# Altium PCB LED_Strip_RL.PcbDoc
Units mm, origin at the board's own origin, x right, y up, seen from the top; angles counter-clockwise.
Board outline 210 x 7 mm, 2 copper layers (Top Layer, Bottom Layer); 33 components, 31 nets, 123 pads, 13 vias.
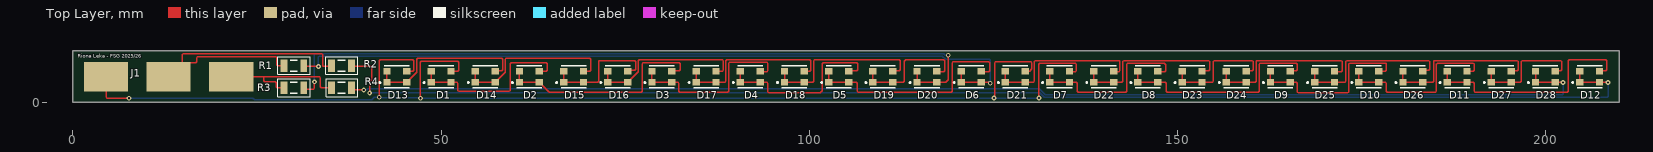
[diagram p0: Top Layer view]
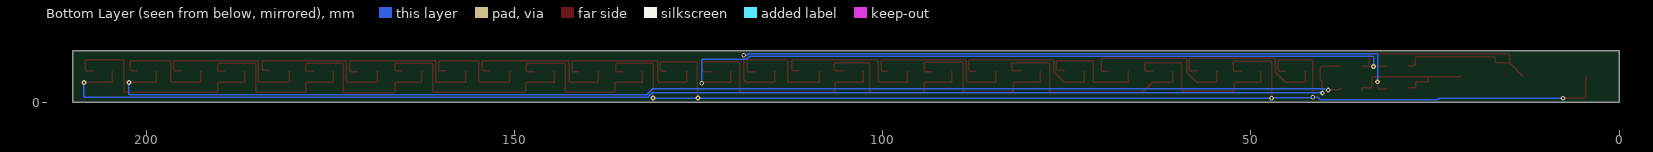
[diagram p1: Bottom Layer view, seen from below]
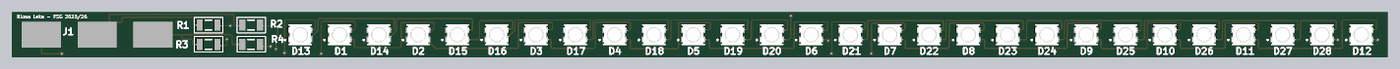
[diagram p2: 3D render of the assembled board from above, using the file's embedded part models]

## Layer stack, top to bottom
Top Solder: solder mask 0.0102, Solder Resist, Dk 3.5
Top Layer: signal copper 0.0356
Dielectric 1: dielectric 0.32, FR-4, Dk 4.8
Bottom Layer: signal copper 0.0356
Bottom Solder: solder mask 0.0102, Solder Resist, Dk 3.5

## Board outline
0,0 0,7 210,7 210,0

## Design rules (kind name [scope] priority, off if disabled: settings)
AcuteAngle [All] p1: minimum=6.00000000000000E+0001 checktracksonly=FALSE
BoardOutlineClearance "BoardOutlineClearance Overlay" [OnLayer('Top Overlay') or OnLayer('Bottom Overlay')] p1: gap=-2 ignorepadtopadclearanceinfootprint=FALSE
BoardOutlineClearance "BoardOutlineClearance general" [All] p2: gap=0.25 ignorepadtopadclearanceinfootprint=FALSE
Clearance "Clearance TS-LV without coating" [InNetClass('TS') vs InNetClass('LV')] p1: gap=20 ignorepadtopadclearanceinfootprint=TRUE except(0: Arc-Text Track-Text SMDPad-Text THPad-Text Via-Text Fill-Text Poly-Text Region-Text Text-Text Text-Hole) // without Conformal Coating (Rules 2023.1.0: EV 4.3.6)
Clearance "Clearance TS-LV" [InNetClass('TS') vs InNetClass('LV')] p2: gap=4.15 ignorepadtopadclearanceinfootprint=TRUE except(0: Arc-Text Track-Text SMDPad-Text THPad-Text Via-Text Fill-Text Poly-Text Region-Text Text-Text)
Clearance "Clearance TS-TS" [InNetClass('TS+') vs InNetClass('TS-')] p3: gap=3.15 ignorepadtopadclearanceinfootprint=TRUE except(0: Arc-Text Track-Text SMDPad-Text THPad-Text Via-Text Fill-Text Poly-Text Region-Text Text-Text)
Clearance "Clearance general" [All] p4: gap=0.15 ignorepadtopadclearanceinfootprint=TRUE except(0: Arc-Text Track-Text SMDPad-Text THPad-Text Via-Text Text-Text)
ComponentClearance [All] p1: gap=0.1 collisioncheckmode=3 verticalgap=1 showdistances=FALSE donotcheckwithout3dbody=TRUE
Creepage [InNetClass('TS') vs InNetClass('LV')] p1: checkdistance=5 applytopolygonpour=TRUE // Kriechstrecke
DiffPairsRouting [All] p1: maxlimit=0.5 minlimit=0.15 mostfreqgap=0.2 toplayer_minwidth=0.15 toplayer_maxwidth=0.5 toplayer_prefwidth=0.2 bottomlayer_minwidth=0.15 bottomlayer_maxwidth=0.5 bottomlayer_prefwidth=0.2 maxuncoupledlength=12.7
Height [All] p1: minheight=0 maxheight=100 prefheight=15
HoleSize [All] p1: absolutevalues=TRUE maxlimit=5 minlimit=0.25 maxpercent=80.000 minpercent=20.000
HoleToHoleClearance [All] p1: gap=0.5 allowstackedmicrovias=FALSE
MinimumAnnularRing [All] p1: minimumring=0.175
MinimumSolderMaskSliver [All] p1: minsoldermaskwidth=0.15
PasteMaskExpansion "PasteMaskExpansion THT" [OnMultiLayer] p1: expansion=-2539.975 usepaste=FALSE // THT-parts without paste
PasteMaskExpansion [All] p2: expansion=0 percent=10.000000
PlaneClearance [All] p1: clearance=0.5
PlaneConnect [All] p1: planeconnectstyle=Relief reliefexpansion=0.5 reliefentries=4 reliefconductorwidth=0.25 reliefairgap=0.15
PolygonConnect "PolygonConnect Stitching Via" [IsStitchingVia] p1: connectstyle=Direct reliefconductorwidth=0.254 reliefentries=4 polygonreliefangle="90 Angle" airgapwidth=0.254
PolygonConnect "PolygonConnect general" [All] p2: thpad.connectstyle=Relief thpad.reliefconductorwidth=0.25 thpad.reliefentries=4 thpad.polygonreliefangle="45 Angle" thpad.airgapwidth=0.2 smdpad.connectstyle=Relief smdpad.reliefconductorwidth=0.25 smdpad.reliefentries=4 smdpad.polygonreliefangle="90 Angle" smdpad.airgapwidth=0.2 via.connectstyle=Relief via.reliefconductorwidth=0.25 via.reliefentries=4 via.polygonreliefangle="45 Angle" via.airgapwidth=0.2
RoutingCorners [All] p1: cornerstyle=45-Degree minsetback=2.5 maxsetback=2.5
RoutingTopology "RoutingTopology Top" [OnLayer('Top Layer')] p1: topology=Vertical // Helplines top-layer
RoutingTopology "RoutingTopology Bottom" [OnLayer('Bottom Layer')] p2: topology=Horizontal // Helplines bottom-layer
RoutingVias "RoutingVias StitchingVias" [IsStitchingVia] p1: holewidth=0.3 width=0.65 viastyle="Through Hole" minholewidth=0.25 minwidth=0.6 maxholewidth=0.3 maxwidth=0.65
RoutingVias "RoutingVias general" [All] p2: holewidth=0.3 width=0.65 viastyle="Through Hole" minholewidth=0.25 minwidth=0.6 maxholewidth=0.6 maxwidth=0.85
SMDToCorner [All] p1: distance=39370
SilkToSilkClearance [All] p1: silktosilkclearance=0
SilkToSolderMaskClearance [IsPad] p1: minsilkscreentomaskgap=0.1 clearancetoexposedcopper=FALSE
SolderMaskExpansion "SolderMaskExpansion Vias" [IsVia] p1: expansion=0.1 istentingtop=TRUE // vias tented
SolderMaskExpansion "SolderMaskExpansion general" [All] p2: expansion=0.1 istentingtop=FALSE
UnRoutedNet [All] p1: checkbadconnections=TRUE
Width "Width Powerlane" [InNetClass('Power')] p1: maxlimit=5 minlimit=0.15 preferedwidth=0.5
Width "Width general" [All] p2: maxlimit=3 minlimit=0.15 preferedwidth=0.2
16 further rules are at their usual default settings.

## Components (designator, comment, footprint, x,y, rotation, side; value= is the part's Value field where it differs from the comment)
D1 "Blue, 3.2V, 120°" "WL-SMTW_3528_LPCC 4" 50,3.5 r0 top
D2 "Blue, 3.2V, 120°" "WL-SMTW_3528_LPCC 4" 62,3.5 r0 top
D3 "Blue, 3.2V, 120°" "WL-SMTW_3528_LPCC 4" 80,3.5 r0 top
D4 "Blue, 3.2V, 120°" "WL-SMTW_3528_LPCC 4" 92,3.5 r0 top
D5 "Blue, 3.2V, 120°" "WL-SMTW_3528_LPCC 4" 104,3.5 r0 top
D6 "Blue, 3.2V, 120°" "WL-SMTW_3528_LPCC 4" 122,3.5 r0 top
D7 "Blue, 3.2V, 120°" "WL-SMTW_3528_LPCC 4" 134,3.5 r0 top
D8 "Blue, 3.2V, 120°" "WL-SMTW_3528_LPCC 4" 146,3.5 r0 top
D9 "Blue, 3.2V, 120°" "WL-SMTW_3528_LPCC 4" 164,3.5 r0 top
D10 "Blue, 3.2V, 120°" "WL-SMTW_3528_LPCC 4" 176,3.5 r0 top
D11 "Blue, 3.2V, 120°" "WL-SMTW_3528_LPCC 4" 188,3.5 r0 top
D12 "Blue, 3.2V, 120°" "WL-SMTW_3528_LPCC 4" 206,3.5 r0 top
D13 "Yellow, 2.4V, 120°" "WL-SMTW_3528_LPCC 4" 44,3.5 r0 top
D14 "Yellow, 2.4V, 120°" "WL-SMTW_3528_LPCC 4" 56,3.5 r0 top
D15 "Yellow, 2.4V, 120°" "WL-SMTW_3528_LPCC 4" 68,3.5 r0 top
D16 "Yellow, 2.4V, 120°" "WL-SMTW_3528_LPCC 4" 74,3.5 r0 top
D17 "Yellow, 2.4V, 120°" "WL-SMTW_3528_LPCC 4" 86,3.5 r0 top
D18 "Yellow, 2.4V, 120°" "WL-SMTW_3528_LPCC 4" 98,3.5 r0 top
D19 "Yellow, 2.4V, 120°" "WL-SMTW_3528_LPCC 4" 110,3.5 r0 top
D20 "Yellow, 2.4V, 120°" "WL-SMTW_3528_LPCC 4" 116,3.5 r0 top
D21 "Yellow, 2.4V, 120°" "WL-SMTW_3528_LPCC 4" 128,3.5 r0 top
D22 "Yellow, 2.4V, 120°" "WL-SMTW_3528_LPCC 4" 140,3.5 r0 top
D23 "Yellow, 2.4V, 120°" "WL-SMTW_3528_LPCC 4" 152,3.5 r0 top
D24 "Yellow, 2.4V, 120°" "WL-SMTW_3528_LPCC 4" 158,3.5 r0 top
D25 "Yellow, 2.4V, 120°" "WL-SMTW_3528_LPCC 4" 170,3.5 r0 top
D26 "Yellow, 2.4V, 120°" "WL-SMTW_3528_LPCC 4" 182,3.5 r0 top
D27 "Yellow, 2.4V, 120°" "WL-SMTW_3528_LPCC 4" 194,3.5 r0 top
D28 "Yellow, 2.4V, 120°" "WL-SMTW_3528_LPCC 4" 200,3.5 r0 top
J1 "Pad-Connenctor" "TSAL-L Connector" 13,3.5 r90 top
R1 "Resistor" 1206(3216)_L 30,5 r180 top value=100R
R2 "Resistor" 1206(3216)_L 36.5,5 r180 top value=100R
R3 "Resistor" 1206(3216)_L 30,2 r180 top value=120R
R4 "Resistor" 1206(3216)_L 36.5,2 r180 top value=120R

## Footprints (in the part's own frame and the unit in brackets; to place one, negate y for a bottom-side part, rotate by r counter-clockwise, add the part's x,y. Pads: shape width x height; smd on the part's side, far side on the other; paste and mask are expansions set on the pad)
1206(3216)_L [mm] "Chip Resistor, Body 3.2x1.6mm, IPC High Density"
  rect 0.95x1.7 smd: 1(-1.35,0) 2(1.35,0)
  silkscreen extent -2.2,-1.2 2.2,1.2, body extent -1.67,-0.87 1.67,0.87, height 0.75
"TSAL-L Connector" [mm]
  rect 4x6 smd paste+0 mask+0: 1(0,8.5) 2(0,0) 3(0,-8.5)
"WL-SMTW_3528_LPCC 4" [mm] "SMD Mono-color TOP LED, body 3.5x2.8mm"
  rect 1x0.9 smd: 1(-1.35,-0.75) 2(1.35,-0.75) 3(1.35,0.75) 4(-1.35,0.75)
  silkscreen extent -2.4,-1.5 1.7,1.5, body extent -1.75,-1.4 1.75,1.4, height 1.86

## Part data
D1 D2 D3 D4 D5 D6 D7 D8 D9 D10 D11 D12: library part 150141BS73130, "WL-SMTW Mono-color TOP LED Waterclear, size 3528, Blue, 3.2V, 120°", Case/Size Code=3528, Emitting Color=Blue, Forward Voltage=3.2V, Manufacturer="Wurth Elektronik", Operating Temperature Max=85°C, Operating Temperature Min=-40°C, Category="Signal LEDs", Chip Technology=InGaN, ComponentLink1Description="Website Link", ComponentLink1URL=https://www.we-online.com/redexpert/article/150141BS73130?ad, ComponentLink2Description="Datasheet Link", ComponentLink2URL=https://www.we-online.com/redexpert/spec/150141BS73130?ad, Dominant Wavelength=470nm, Height=1.85mm, Length=3.5mm, Luminous Intensity=1000mcd, Manufacturer Part Number=150141BS73130, Match Code=WL-SMTW, Mount="Surface Mount", Packaging="Tape and Reel", Peak Wavelength=465nm, Viewing Angle=120°, Width=2.8mm
D13 D14 D15 D16 D17 D18 D19 D20 D21 D22 D23 D24 D25 D26 D27 D28: library part 150141YS73130, "WL-SMTW Mono-color TOP LED Waterclear, size 3528, Yellow, 2.4V, 120°", Case/Size Code=3528, Emitting Color=Yellow, Forward Voltage=2.4V, Manufacturer="Wurth Elektronik", Operating Temperature Max=85°C, Operating Temperature Min=-40°C, Category="Signal LEDs", Chip Technology=AlInGaP, ComponentLink1Description="Website Link", ComponentLink1URL=https://www.we-online.com/redexpert/article/150141YS73130?ad, ComponentLink2Description="Datasheet Link", ComponentLink2URL=https://www.we-online.com/redexpert/spec/150141YS73130?ad, Dominant Wavelength=590nm, Height=1.85mm, Length=3.5mm, Luminous Intensity=2000mcd, Manufacturer Part Number=150141YS73130, Match Code=WL-SMTW, Mount="Surface Mount", Packaging="Tape and Reel", Peak Wavelength=592nm, Viewing Angle=120°, Width=2.8mm
J1: library part Pad-Connector, "3 pins. fits the 7mm"
R1 R2: library part RES-Std, "General resistor", Resistance=100R, Tolerance=*%
R3 R4: library part RES-Std, "General resistor", Resistance=120R, Tolerance=*%

## Via types
v1: diameter 0.65, hole 0.3, Top Layer to Bottom Layer, tented both sides, 13 vias

## Nets (pads, with @x,y where several pads share a name; then routed paths per layer and width w, separated by ;. In a path a pad name is that pad's centre, name@x,y a point inside that pad or via, vN(x,y) a via of type N, cw(c..) or ccw(c..) an arc to the next point about the centre after c; other vN are vias at no path point)
+24V: D1.3 D7.3 D13.3 D21.3 J1.1 | length 177.9
  Top Layer w0.2: J1.1 4.5,0.692 4.617,0.575 v1(7.6,0.575) ; v1(41.6,0.7) 41.6,5.683 41.717,5.8 46.183,5.8 46.3,5.683 46.3,4.367 46.183,4.25 D13.3 ; v1(47.2,0.575) 47.2,5.483 47.317,5.6 52.283,5.6 52.4,5.483 52.4,4.367 52.283,4.25 D1.3 ; v1(125.1,0.6) 125.175,0.675 125.175,5.375 125.3,5.5 130.133,5.5 130.25,5.383 130.25,4.55 129.95,4.25 D21.3 ; v1(131.2,0.6) 131.2,5.183 131.317,5.3 136.183,5.3 136.3,5.183 136.3,4.317 136.183,4.2 135.4,4.2 D7.3
  Bottom Layer w0.2: v1(7.6,0.575) 24.447,0.575 24.672,0.35 40.558,0.35 40.908,0.7 v1(41.6,0.7) 41.663,0.637 47.137,0.637 v1(47.2,0.575) 47.213,0.587 125.087,0.587 v1(125.1,0.6) v1(131.2,0.6)
BLUE_ASSI: J1.2 R1.2 R2.2 | length 41.1
  Top Layer w0.2: J1.2 J1.2@14.871,5.371 ; R1.2 27.817,5 27.7,5.117 27.7,6.083 27.583,6.2 16.917,6.2 16.8,6.083 16.8,5.5 16.671,5.371 J1.2@14.871,5.371 ; R2.2@35,4.9 34.017,4.9 33.9,5.017 33.9,6.533 33.783,6.65 14.988,6.65 14.871,6.533 J1.2@14.871,5.371
NetD1_1: D1.1 D1.2 D1.4 D2.3 | length 24.2
  Top Layer w0.2: D1.4 D1.1 D1.2 52.183,2.75 52.3,2.633 52.3,1.617 52.417,1.5 59.283,1.5 59.4,1.617 59.4,5.283 59.517,5.4 64.283,5.4 64.4,5.283 64.4,4.367 64.283,4.25 D2.3
NetD2_1: D2.1 D2.2 D2.4 D3.3 | length 29.9
  Top Layer w0.2: D2.4 D2.1 D2.2 64.7,1.4 77.183,1.4 77.3,1.517 77.3,5.283 77.417,5.4 82.383,5.4 82.5,5.283 82.5,4.417 82.383,4.3 81.4,4.3 D3.3
NetD3_1: D3.1 D3.2 D3.4 D4.3 | length 24.6
  Top Layer w0.2: D3.4 D3.1 D3.2 82.183,2.75 82.3,2.633 82.3,1.517 82.417,1.4 88.933,1.4 89.05,1.517 89.05,5.333 89.167,5.45 94.283,5.45 94.4,5.333 94.4,4.317 94.283,4.2 93.4,4.2 D4.3
NetD4_1: D4.1 D4.2 D4.4 D5.3 | length 24.9
  Top Layer w0.2: D4.4 D4.1 D4.2 94.283,2.75 94.4,2.633 94.4,1.417 94.517,1.3 101.483,1.3 101.765,1.582 101.765,5.283 101.882,5.4 106.483,5.4 106.6,5.283 106.6,4.417 106.483,4.3 105.4,4.3 D5.3
NetD5_1: D5.1 D5.2 D5.4 D6.3 | length 30.9
  Top Layer w0.2: D5.4 D5.1 D5.2 106.383,2.75 106.5,2.633 106.5,1.517 106.617,1.4 119.283,1.4 119.4,1.517 119.4,5.383 119.517,5.5 124.383,5.5 124.5,5.383 124.5,4.317 124.383,4.2 123.4,4.2 D6.3
NetD6_1: D6.1 D6.2 D6.4 R1.1 | length 103.3
  Top Layer w0.2: R1.1@31.55,5 31.65,4.9 v1(33.336,4.9) ; D6.4 D6.1 124.328,2.75 124.478,2.6 v1(124.6,2.6)
  Bottom Layer w0.2: v1(33.336,4.9) 33.334,4.902 33.334,6.183 33.451,6.3 118.1,6.3 118.55,5.85 124.483,5.85 124.6,5.733 v1(124.6,2.6)
NetD7_1: D7.1 D7.2 D7.4 D8.3 | length 24.2
  Top Layer w0.2: D7.4 D7.1 D7.2 136.25,2.75 136.4,2.6 136.4,1.517 136.517,1.4 142.983,1.4 143.1,1.517 143.1,5.183 143.217,5.3 148.2,5.3 148.4,5.1 148.4,4.317 148.283,4.2 147.4,4.2 D8.3
NetD8_1: D8.1 D8.2 D8.4 D9.3 | length 29.9
  Top Layer w0.2: D8.4 D8.1 D8.2 148.35,2.75 148.5,2.6 148.5,1.517 148.617,1.4 160.983,1.4 161.1,1.517 161.1,5.183 161.217,5.3 166.183,5.3 166.3,5.183 166.3,4.417 166.183,4.3 165.4,4.3 D9.3
NetD9_1: D9.1 D9.2 D9.4 D10.3 | length 24.5
  Top Layer w0.2: D9.4 D9.1 D9.2 166.183,2.75 166.3,2.633 166.3,1.417 166.417,1.3 173.183,1.3 173.3,1.417 173.3,5.233 173.417,5.35 178.283,5.35 178.4,5.233 178.4,4.4 178.25,4.25 D10.3
NetD10_1: D10.1 D10.2 D10.4 D11.3 | length 24.1
  Top Layer w0.2: D10.4 D10.1 D10.2 178.283,2.75 178.4,2.633 178.4,1.517 178.517,1.4 185.083,1.4 185.2,1.517 185.2,5.183 185.367,5.35 190.183,5.35 190.3,5.233 190.3,4.367 190.183,4.25 D11.3
NetD11_1: D11.1 D11.2 D11.4 D12.3 | length 31
  Top Layer w0.2: D11.4 D11.1 D11.2 190.183,2.75 190.3,2.633 190.3,1.517 190.417,1.4 202.983,1.4 203.1,1.517 203.1,5.683 203.217,5.8 208.183,5.8 208.3,5.683 208.3,4.417 208.183,4.3 207.4,4.3 D12.3
NetD12_1: D12.1 D12.2 D12.4 R2.1 | length 182.1
  Top Layer w0.2: R2.1@37.9,4.9 40.45,4.9 40.567,4.783 40.567,3.086 40.3,2.819 v1(40.3,1.3) ; D12.4 D12.1 D12.2 208.45,2.75 v1(208.5,2.7)
  Bottom Layer w0.2: v1(40.3,1.3) 131.313,1.3 131.913,0.7 208.383,0.7 208.5,0.817 v1(208.5,2.7)
NetD13_1: D13.1 D13.2 D13.4 D14.3 | length 22.2
  Top Layer w0.2: D13.4 D13.1 D13.2 46.7,4.1 46.7,5.883 46.817,6 58.233,6 58.35,5.883 58.35,4.417 58.233,4.3 57.4,4.3 D14.3
NetD14_1: D14.1 D14.2 D14.4 D15.3 | length 22.1
  Top Layer w0.2: D14.4 D14.1 D14.2 58.7,4.1 58.7,5.883 58.817,6 70.183,6 70.3,5.883 70.3,4.367 70.183,4.25 D15.3
NetD15_1: D15.1 D15.2 D15.4 D16.3 | length 16.4
  Top Layer w0.2: D15.4 D15.1 D15.2 71.283,2.75 71.4,2.867 71.4,5.583 71.517,5.7 76.3,5.7 76.45,5.55 76.45,4.517 76.333,4.4 75.5,4.4 D16.3
NetD16_1: D16.1 D16.2 D16.4 D17.3 | length 21.7
  Top Layer w0.2: D16.4 D16.1 D16.2 76.8,4.2 76.8,5.683 76.917,5.8 88.233,5.8 88.35,5.683 88.35,4.367 88.233,4.25 D17.3
NetD17_1: D17.1 D17.2 D17.4 D18.3 | length 22.2
  Top Layer w0.2: D17.4 D17.1 D17.2 88.583,2.75 88.7,2.867 88.7,5.683 88.817,5.8 100.083,5.8 100.2,5.683 100.2,4.367 100.083,4.25 D18.3
NetD18_1: D18.1 D18.2 D18.4 D19.3 | length 22.5
  Top Layer w0.2: D18.4 D18.1 D18.2 100.483,2.75 100.6,2.867 100.6,5.683 100.717,5.8 112.233,5.8 112.35,5.683 112.35,4.417 112.233,4.3 111.4,4.3 D19.3
NetD19_1: D19.1 D19.2 D19.4 D20.3 | length 16.6
  Top Layer w0.2: D19.4 D19.1 D19.2 112.783,2.75 112.9,2.867 112.9,5.6 113.1,5.8 118.283,5.8 118.4,5.683 118.4,4.317 118.283,4.2 117.4,4.2 D20.3
NetD20_1: D20.1 D20.2 D20.4 R3.1 | length 101.5
  Top Layer w0.2: R3.1@31.55,2 31.75,1.8 32.683,1.8 32.8,1.917 v1(32.8,2.8) ; D20.4 D20.1 D20.2 118.55,2.75 118.9,3.1 v1(118.9,6.425)
  Bottom Layer w0.2: v1(32.8,2.8) 32.761,2.839 32.761,6.533 32.879,6.65 118.245,6.65 118.47,6.425 v1(118.9,6.425)
NetD21_1: D21.1 D21.2 D21.4 D22.3 | length 22.1
  Top Layer w0.2: D21.4 D21.1 D21.2 130.483,2.75 130.6,2.867 130.6,5.583 130.717,5.7 142.083,5.7 142.2,5.583 142.2,4.317 142.083,4.2 141.4,4.2 D22.3
NetD22_1: D22.1 D22.2 D22.4 D23.3 | length 22.4
  Top Layer w0.2: D22.4 D22.1 D22.2 142.483,2.75 142.6,2.867 142.6,5.583 142.717,5.7 154.283,5.7 154.4,5.583 154.4,4.417 154.283,4.3 153.4,4.3 D23.3
NetD23_1: D23.1 D23.2 D23.4 D24.3 | length 16.2
  Top Layer w0.2: D23.4 D23.1 D23.2 154.783,2.75 154.9,2.867 154.9,5.583 155.017,5.7 160.183,5.7 160.3,5.583 160.3,4.417 160.183,4.3 159.4,4.3 D24.3
NetD24_1: D24.1 D24.2 D24.4 D25.3 | length 22.5
  Top Layer w0.2: D24.4 D24.1 D24.2 160.583,2.75 160.7,2.867 160.7,5.583 160.817,5.7 172.283,5.7 172.4,5.583 172.4,4.317 172.283,4.2 171.4,4.2 D25.3
NetD25_1: D25.1 D25.2 D25.4 D26.3 | length 22.1
  Top Layer w0.2: D25.4 D25.1 D25.2 172.783,2.75 172.9,2.867 172.9,5.583 173.017,5.7 184.183,5.7 184.3,5.583 184.3,4.517 184.183,4.4 183.5,4.4 D26.3
NetD26_1: D26.1 D26.2 D26.4 D27.3 | length 22.2
  Top Layer w0.2: D26.4 D26.1 D26.2 184.683,2.75 184.8,2.867 184.8,5.583 184.917,5.7 196.183,5.7 196.3,5.583 196.3,4.417 196.183,4.3 195.4,4.3 D27.3
NetD27_1: D27.1 D27.2 D27.4 D28.3 | length 16
  Top Layer w0.2: D27.4 D27.1 D27.2 196.583,2.75 196.7,2.867 196.7,5.583 196.817,5.7 202.083,5.7 202.2,5.583 202.2,4.417 202.083,4.3 201.4,4.3 D28.3
NetD28_1: D28.1 D28.2 D28.4 R4.1 | length 172.2
  Top Layer w0.2: R4.1@37.75,2 38.05,1.7 v1(39.5,1.7) ; D28.4 D28.1 D28.2 202.35,2.75 v1(202.4,2.7)
  Bottom Layer w0.2: v1@39.3,1.7 39.338,1.738 39.925,1.738 40.062,1.875 131.233,1.875 132.058,1.05 202.283,1.05 202.4,1.167 v1(202.4,2.7)
YELLOW_ASSI: J1.3 R3.2 R4.2 | length 19.3
  Top Layer w0.2: J1.3 25.9,3.5 ; R3.2 27.717,2 27.6,2.117 27.6,2.683 27.483,2.8 26.067,2.8 25.95,2.917 25.95,3.45 25.9,3.5 ; R4.2@34.95,1.5 34.95,2 33.73,2 33.613,2.117 33.613,3.387 33.5,3.5 25.9,3.5

## Silkscreen, mask and mechanical layers (free items; w line width, h text height)
Top Overlay:
  text "Riona Leka - FSG 2025/26" at 0.65,6.05 h0.5